# Altium PCB Pod_Islands_Panel.PcbDoc (part 8 of 10)
Units mm, origin at the board's own origin, x right, y up, seen from the top; angles counter-clockwise.
Board outline 95.7 x 83.7 mm, 6 copper layers (Top Layer, Inner1, Inner2, Inner3, Inner4, Bottom Layer), stack 0.82 mm thick; 1100 components, 940 nets, 4944 pads, 3680 vias.
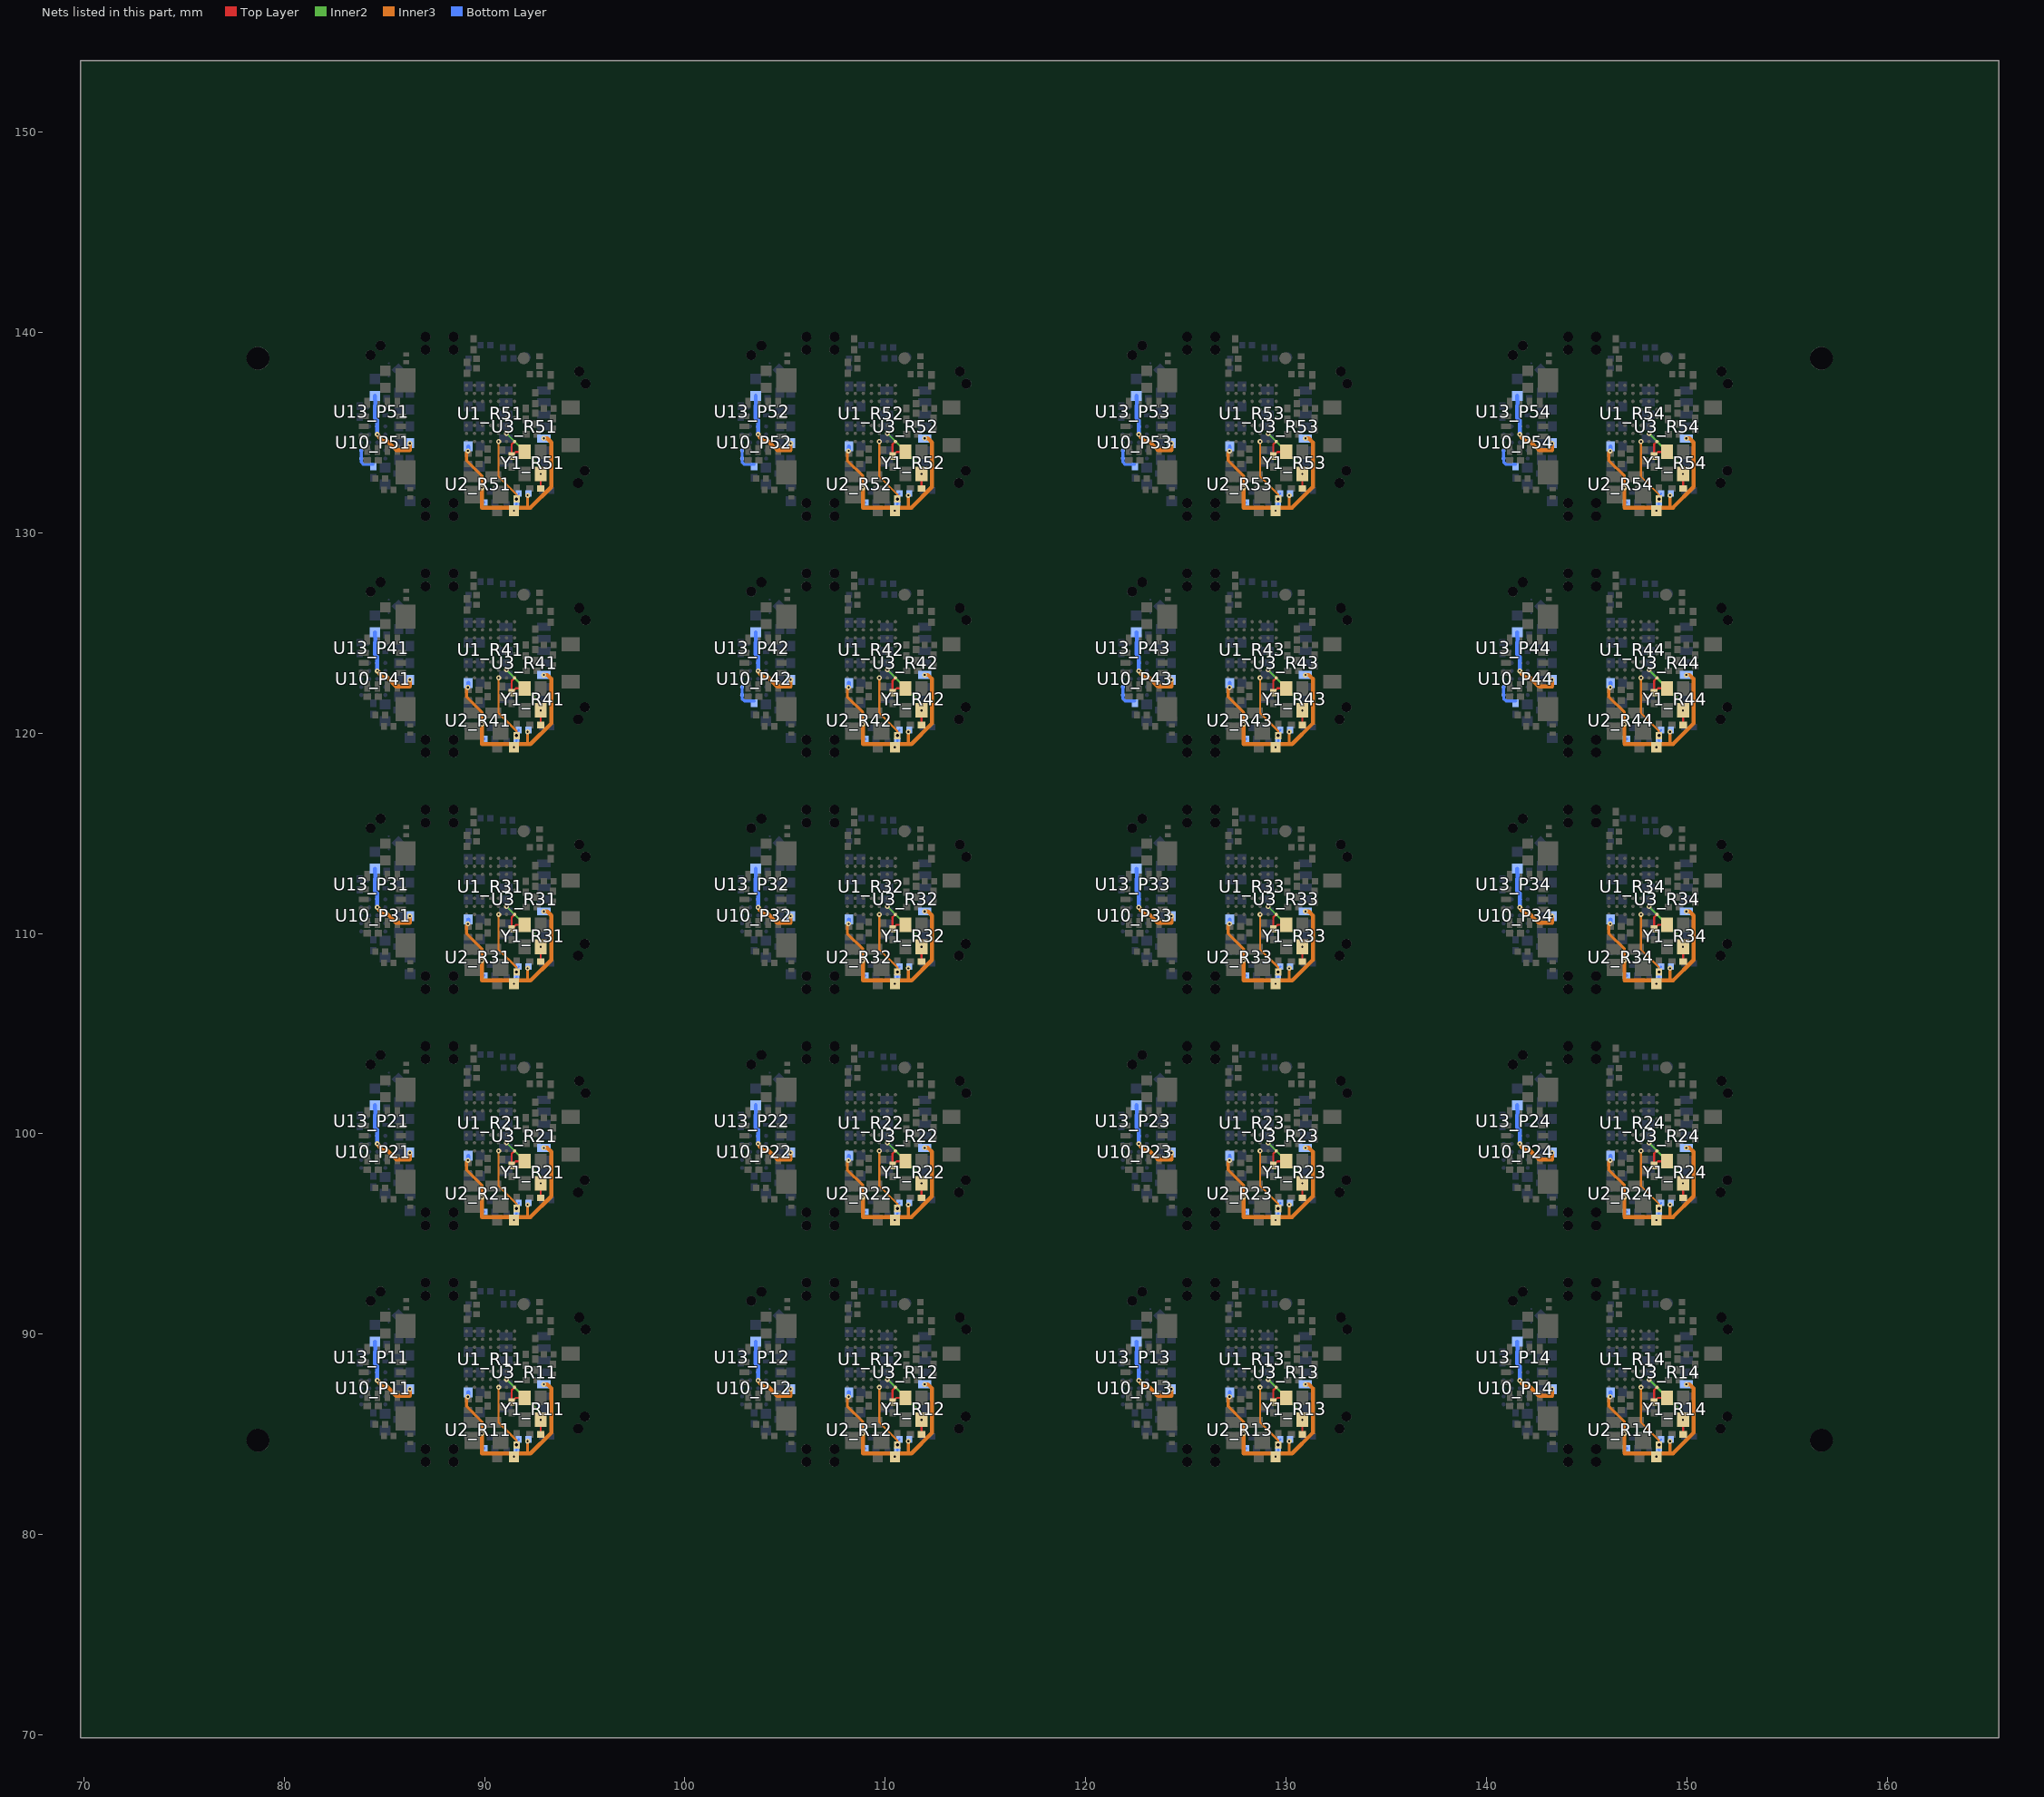
[diagram p12: the nets of this part, all layers, seen from the top]

## Via types
v1: diameter 0.249, hole 0.102, Top Layer to Inner1, 920 vias
v2: diameter 0.249, hole 0.102, Inner1 to Bottom Layer, 740 vias
v3: diameter 0.249, hole 0.102, Top Layer to Inner4, 580 vias
v4: diameter 0.249, hole 0.152, Top Layer to Bottom Layer, 540 vias
v5: diameter 0.249, hole 0.102, Inner4 to Bottom Layer, 520 vias
v6: diameter 0.3, hole 0.152, Inner1 to Inner4, 380 vias

## Nets (pads, with @x,y where several pads share a name; then routed paths per layer and width w, separated by ;. In a path a pad name is that pad's centre, name@x,y a point inside that pad or via, vN(x,y) a via of type N, cw(c..) or ccw(c..) an arc to the next point about the centre after c; other vN are vias at no path point) (continued)
VINLS_P42: C56_P42.1 U10_P42.D4 U10_P42.E4 | length 1.2
  Bottom Layer w0.15: U10_P42.D4@102.85,122.3 U10_P42.E4@102.85,121.9 102.85,121.72 102.97,121.6 C56_P42.1@103.449,121.6
VINLS_P43: C56_P43.1 U10_P43.D4 U10_P43.E4 | length 1.2
  Bottom Layer w0.15: U10_P43.D4@121.85,122.3 U10_P43.E4@121.85,121.9 121.85,121.72 121.97,121.6 C56_P43.1@122.449,121.6
VINLS_P44: C56_P44.1 U10_P44.D4 U10_P44.E4 | length 1.2
  Bottom Layer w0.15: U10_P44.D4@140.85,122.3 U10_P44.E4@140.85,121.9 140.85,121.72 140.97,121.6 C56_P44.1@141.449,121.6
VINLS_P51: C56_P51.1 U10_P51.D4 U10_P51.E4 | length 1.2
  Bottom Layer w0.15: U10_P51.D4@83.85,134.1 83.85,133.699 83.85,133.52 83.97,133.4 C56_P51.1@84.449,133.4
VINLS_P52: C56_P52.1 U10_P52.D4 U10_P52.E4 | length 1.2
  Bottom Layer w0.15: U10_P52.D4@102.85,134.1 102.85,133.699 102.85,133.52 102.97,133.4 C56_P52.1@103.449,133.4
VINLS_P53: C56_P53.1 U10_P53.D4 U10_P53.E4 | length 1.2
  Bottom Layer w0.15: U10_P53.D4@121.85,134.1 121.85,133.699 121.85,133.52 121.97,133.4 C56_P53.1@122.449,133.4
VINLS_P54: C56_P54.1 U10_P54.D4 U10_P54.E4 | length 1.2
  Bottom Layer w0.15: U10_P54.D4@140.85,134.1 140.85,133.699 140.85,133.52 140.97,133.4 C56_P54.1@141.449,133.4
VSYS_P11: C51_P11.1 pad.JP2@86.274,87.261 U10_P11.A2 U10_P11.B2 U13_P11.A1 U13_P11.B1 | length 4.3
  Inner3 w0.2: v2(84.65,87.7) 84.725,87.625 84.725,87.575 84.925,87.375 85.15,87.375 85.6,86.925 86.275,86.925 v2(86.275,87.261)
  Bottom Layer w0.2: C51_P11.1@84.531,89.631 84.551,89.15 84.525,89.124 84.525,89.026 84.525,88.676 84.525,88.525 84.65,88.4 U10_P11.A2@84.65,88.1 v2(84.65,87.7)
VSYS_P12: C51_P12.1 pad.JP2@105.276,87.261 U10_P12.A2 U10_P12.B2 U13_P12.A1 U13_P12.B1 | length 4.3
  Inner3 w0.2: v2(103.65,87.7) 103.725,87.625 103.725,87.575 103.925,87.375 104.15,87.375 104.6,86.925 105.275,86.925 v2(105.275,87.261)
  Bottom Layer w0.2: C51_P12.1@103.531,89.631 103.551,89.15 103.525,89.124 103.525,89.026 103.525,88.676 103.525,88.525 103.65,88.4 U10_P12.A2@103.65,88.1 v2(103.65,87.7)
VSYS_P13: C51_P13.1 pad.JP2@124.275,87.261 U10_P13.A2 U10_P13.B2 U13_P13.A1 U13_P13.B1 | length 4.3
  Inner3 w0.2: v2(122.65,87.7) 122.725,87.625 122.725,87.575 122.925,87.375 123.15,87.375 123.6,86.925 124.275,86.925 v2(124.275,87.261)
  Bottom Layer w0.2: C51_P13.1@122.531,89.631 122.551,89.15 122.525,89.124 122.525,89.026 122.525,88.676 122.525,88.525 122.65,88.4 U10_P13.A2@122.65,88.1 v2(122.65,87.7)
VSYS_P14: C51_P14.1 pad.JP2@143.274,87.261 U10_P14.A2 U10_P14.B2 U13_P14.A1 U13_P14.B1 | length 4.3
  Inner3 w0.2: v2(141.65,87.7) 141.725,87.625 141.725,87.575 141.925,87.375 142.15,87.375 142.6,86.925 143.275,86.925 v2(143.275,87.261)
  Bottom Layer w0.2: C51_P14.1@141.531,89.631 141.551,89.15 141.525,89.124 141.525,89.026 141.525,88.676 141.525,88.525 141.65,88.4 U10_P14.A2@141.65,88.1 v2(141.65,87.7)
VSYS_P21: C51_P21.1 pad.JP2@86.274,99.062 U10_P21.A2 U10_P21.B2 U13_P21.A1 U13_P21.B1 | length 4.3
  Inner3 w0.2: v2(84.65,99.5) 84.725,99.425 84.725,99.375 84.925,99.175 85.15,99.175 85.6,98.725 86.275,98.725 v2(86.275,99.061)
  Bottom Layer w0.2: C51_P21.1@84.53,101.43 84.551,100.95 84.525,100.924 U13_P21.A1@84.525,100.825 U13_P21.B1@84.525,100.475 84.525,100.325 84.65,100.2 84.65,99.899 v2(84.65,99.5)
VSYS_P22: C51_P22.1 pad.JP2@105.276,99.062 U10_P22.A2 U10_P22.B2 U13_P22.A1 U13_P22.B1 | length 4.3
  Inner3 w0.2: v2(103.65,99.5) 103.725,99.425 103.725,99.375 103.925,99.175 104.15,99.175 104.6,98.725 105.275,98.725 v2(105.275,99.061)
  Bottom Layer w0.2: C51_P22.1@103.53,101.43 103.551,100.95 103.525,100.924 U13_P22.A1@103.525,100.825 U13_P22.B1@103.525,100.475 103.525,100.325 103.65,100.2 103.65,99.899 v2(103.65,99.5)
VSYS_P23: C51_P23.1 pad.JP2@124.275,99.062 U10_P23.A2 U10_P23.B2 U13_P23.A1 U13_P23.B1 | length 4.3
  Inner3 w0.2: v2(122.65,99.5) 122.725,99.425 122.725,99.375 122.925,99.175 123.15,99.175 123.6,98.725 124.275,98.725 v2(124.275,99.061)
  Bottom Layer w0.2: C51_P23.1@122.53,101.43 122.551,100.95 122.525,100.924 U13_P23.A1@122.525,100.825 U13_P23.B1@122.525,100.475 122.525,100.325 122.65,100.2 122.65,99.899 v2(122.65,99.5)
VSYS_P24: C51_P24.1 pad.JP2@143.274,99.062 U10_P24.A2 U10_P24.B2 U13_P24.A1 U13_P24.B1 | length 4.3
  Inner3 w0.2: v2(141.65,99.5) 141.725,99.425 141.725,99.375 141.925,99.175 142.15,99.175 142.6,98.725 143.275,98.725 v2(143.275,99.061)
  Bottom Layer w0.2: C51_P24.1@141.531,101.431 141.551,100.95 141.525,100.924 U13_P24.A1@141.525,100.825 U13_P24.B1@141.525,100.475 141.525,100.325 141.65,100.2 141.65,99.899 v2(141.65,99.5)
VSYS_P31: C51_P31.1 pad.JP2@86.274,110.86 U10_P31.A2 U10_P31.B2 U13_P31.A1 U13_P31.B1 | length 4.3
  Inner3 w0.2: v2(84.65,111.3) 84.725,111.225 84.725,111.175 84.925,110.975 85.15,110.975 85.6,110.525 86.275,110.525 v2(86.275,110.861)
  Bottom Layer w0.2: C51_P31.1@84.53,113.23 84.551,112.75 84.525,112.724 U13_P31.A1@84.525,112.625 U13_P31.B1@84.525,112.275 84.525,112.125 84.65,112 U10_P31.A2@84.65,111.7 v2(84.65,111.3)
VSYS_P32: C51_P32.1 pad.JP2@105.276,110.86 U10_P32.A2 U10_P32.B2 U13_P32.A1 U13_P32.B1 | length 4.3
  Inner3 w0.2: v2(103.65,111.3) 103.725,111.225 103.725,111.175 103.925,110.975 104.15,110.975 104.6,110.525 105.275,110.525 v2(105.275,110.861)
  Bottom Layer w0.2: C51_P32.1@103.53,113.23 103.551,112.75 103.525,112.724 U13_P32.A1@103.525,112.625 U13_P32.B1@103.525,112.275 103.525,112.125 103.65,112 U10_P32.A2@103.65,111.7 v2(103.65,111.3)
VSYS_P33: C51_P33.1 pad.JP2@124.275,110.86 U10_P33.A2 U10_P33.B2 U13_P33.A1 U13_P33.B1 | length 4.3
  Inner3 w0.2: v2(122.65,111.3) 122.725,111.225 122.725,111.175 122.925,110.975 123.15,110.975 123.6,110.525 124.275,110.525 v2(124.275,110.861)
  Bottom Layer w0.2: C51_P33.1@122.53,113.23 122.551,112.75 122.525,112.724 U13_P33.A1@122.525,112.625 U13_P33.B1@122.525,112.275 122.525,112.125 122.65,112 U10_P33.A2@122.65,111.7 v2(122.65,111.3)
VSYS_P34: C51_P34.1 pad.JP2@143.274,110.86 U10_P34.A2 U10_P34.B2 U13_P34.A1 U13_P34.B1 | length 4.3
  Inner3 w0.2: v2(141.65,111.3) 141.725,111.225 141.725,111.175 141.925,110.975 142.15,110.975 142.6,110.525 143.275,110.525 v2(143.275,110.861)
  Bottom Layer w0.2: C51_P34.1@141.531,113.231 141.551,112.75 141.525,112.724 U13_P34.A1@141.525,112.625 U13_P34.B1@141.525,112.275 141.525,112.125 141.65,112 U10_P34.A2@141.65,111.7 v2(141.65,111.3)
VSYS_P41: C51_P41.1 pad.JP2@86.274,122.661 U10_P41.A2 U10_P41.B2 U13_P41.A1 U13_P41.B1 | length 4.3
  Inner3 w0.2: v2(84.65,123.1) 84.725,123.025 84.725,122.975 84.925,122.775 85.15,122.775 85.6,122.325 86.275,122.325 v2(86.275,122.661)
  Bottom Layer w0.2: C51_P41.1@84.531,125.031 84.551,124.55 84.525,124.524 84.525,124.426 84.525,124.076 84.525,123.925 84.65,123.8 U10_P41.A2@84.65,123.5 v2(84.65,123.1)
VSYS_P42: C51_P42.1 pad.JP2@105.276,122.661 U10_P42.A2 U10_P42.B2 U13_P42.A1 U13_P42.B1 | length 4.3
  Inner3 w0.2: v2(103.65,123.1) 103.725,123.025 103.725,122.975 103.925,122.775 104.15,122.775 104.6,122.325 105.275,122.325 v2(105.275,122.661)
  Bottom Layer w0.2: C51_P42.1@103.531,125.031 103.551,124.55 103.525,124.524 103.525,124.426 103.525,124.076 103.525,123.925 103.65,123.8 U10_P42.A2@103.65,123.5 v2(103.65,123.1)
VSYS_P43: C51_P43.1 pad.JP2@124.275,122.661 U10_P43.A2 U10_P43.B2 U13_P43.A1 U13_P43.B1 | length 4.3
  Inner3 w0.2: v2(122.65,123.1) 122.725,123.025 122.725,122.975 122.925,122.775 123.15,122.775 123.6,122.325 124.275,122.325 v2(124.275,122.661)
  Bottom Layer w0.2: C51_P43.1@122.531,125.031 122.551,124.55 122.525,124.524 122.525,124.426 122.525,124.076 122.525,123.925 122.65,123.8 U10_P43.A2@122.65,123.5 v2(122.65,123.1)
VSYS_P44: C51_P44.1 pad.JP2@143.274,122.661 U10_P44.A2 U10_P44.B2 U13_P44.A1 U13_P44.B1 | length 4.3
  Inner3 w0.2: v2(141.65,123.1) 141.725,123.025 141.725,122.975 141.925,122.775 142.15,122.775 142.6,122.325 143.275,122.325 v2(143.275,122.661)
  Bottom Layer w0.2: C51_P44.1@141.531,125.031 141.551,124.55 141.525,124.524 141.525,124.426 141.525,124.076 141.525,123.925 141.65,123.8 U10_P44.A2@141.65,123.5 v2(141.65,123.1)
VSYS_P51: C51_P51.1 pad.JP2@86.274,134.462 U10_P51.A2 U10_P51.B2 U13_P51.A1 U13_P51.B1 | length 4.3
  Inner3 w0.2: v2(84.65,134.9) 84.725,134.825 84.725,134.775 84.925,134.575 85.15,134.575 85.6,134.125 86.275,134.125 v2(86.275,134.461)
  Bottom Layer w0.2: C51_P51.1@84.53,136.83 84.551,136.35 84.525,136.324 U13_P51.A1@84.525,136.225 U13_P51.B1@84.525,135.875 84.525,135.725 84.65,135.6 84.65,135.299 v2(84.65,134.9)
VSYS_P52: C51_P52.1 pad.JP2@105.276,134.462 U10_P52.A2 U10_P52.B2 U13_P52.A1 U13_P52.B1 | length 4.3
  Inner3 w0.2: v2(103.65,134.9) 103.725,134.825 103.725,134.775 103.925,134.575 104.15,134.575 104.6,134.125 105.275,134.125 v2(105.275,134.461)
  Bottom Layer w0.2: C51_P52.1@103.53,136.83 103.551,136.35 103.525,136.324 U13_P52.A1@103.525,136.225 U13_P52.B1@103.525,135.875 103.525,135.725 103.65,135.6 103.65,135.299 v2(103.65,134.9)
VSYS_P53: C51_P53.1 pad.JP2@124.275,134.462 U10_P53.A2 U10_P53.B2 U13_P53.A1 U13_P53.B1 | length 4.3
  Inner3 w0.2: v2(122.65,134.9) 122.725,134.825 122.725,134.775 122.925,134.575 123.15,134.575 123.6,134.125 124.275,134.125 v2(124.275,134.461)
  Bottom Layer w0.2: C51_P53.1@122.53,136.83 122.551,136.35 122.525,136.324 U13_P53.A1@122.525,136.225 U13_P53.B1@122.525,135.875 122.525,135.725 122.65,135.6 122.65,135.299 v2(122.65,134.9)
VSYS_P54: C51_P54.1 pad.JP2@143.274,134.462 U10_P54.A2 U10_P54.B2 U13_P54.A1 U13_P54.B1 | length 4.3
  Inner3 w0.2: v2(141.65,134.9) 141.725,134.825 141.725,134.775 141.925,134.575 142.15,134.575 142.6,134.125 143.275,134.125 v2(143.275,134.461)
  Bottom Layer w0.2: C51_P54.1@141.531,136.831 141.551,136.35 141.525,136.324 U13_P54.A1@141.525,136.225 U13_P54.B1@141.525,135.875 141.525,135.725 141.65,135.6 141.65,135.299 v2(141.65,134.9)
VSYS_R11: C20_R11.1 C30_R11.1 pad.JR2@89.185,87.101 R40_R11.1 U2_R11.A1 U2_R11.B1 U3_R11.5 | length 11.9
  Inner3 w0.15: v2(89.17,86.88) 89.1,86.81 89.1,86.4 89.876,85.624 v2(89.876,85.046) ; 92.15,84.05 v2(92.15,84.66)
  Inner3 w0.2: v2(89.876,85.046) 89.876,84.05 91.471,84.05 ; v3(91.471,83.89) 91.471,84.05 ; v2(92.959,87.5) 93.13,87.5 93.33,87.3 93.33,85.08 92.3,84.05 92.15,84.05 91.471,84.05
  Bottom Layer w0.15: U2_R11.A1@89.875,85.395 v2(89.876,85.046) 89.876,84.398 C20_R11.1@89.975,84.299
  Bottom Layer w0.2: v2(89.17,86.88) 89.185,86.895 pad.JR2@89.185,87.101
VSYS_R12: C20_R12.1 C30_R12.1 pad.JR2@108.184,87.101 R40_R12.1 U2_R12.A1 U2_R12.B1 U3_R12.5 | length 11.9
  Inner3 w0.15: v2(108.17,86.88) 108.1,86.81 108.1,86.4 108.876,85.624 v2(108.876,85.046) ; 111.15,84.05 v2(111.15,84.66)
  Inner3 w0.2: v2(108.876,85.046) 108.876,84.05 110.471,84.05 ; v3(110.471,83.89) 110.471,84.05 ; v2(111.959,87.5) 112.13,87.5 112.33,87.3 112.33,85.08 111.3,84.05 111.15,84.05 110.471,84.05
  Bottom Layer w0.15: U2_R12.A1@108.875,85.395 v2(108.876,85.046) 108.876,84.398 C20_R12.1@108.976,84.3
  Bottom Layer w0.2: v2(108.17,86.88) 108.185,86.895 pad.JR2@108.185,87.101
VSYS_R13: C20_R13.1 C30_R13.1 pad.JR2@127.186,87.101 R40_R13.1 U2_R13.A1 U2_R13.B1 U3_R13.5 | length 11.9
  Inner3 w0.15: v2(127.17,86.88) 127.1,86.81 127.1,86.4 127.876,85.624 v2(127.876,85.046) ; 130.15,84.05 v2(130.15,84.66)
  Inner3 w0.2: v2(127.876,85.046) 127.876,84.05 129.471,84.05 ; v3(129.471,83.89) 129.471,84.05 ; v2(130.959,87.5) 131.13,87.5 131.33,87.3 131.33,85.08 130.3,84.05 130.15,84.05 129.471,84.05
  Bottom Layer w0.15: U2_R13.A1@127.876,85.394 v2(127.876,85.046) 127.876,84.398 C20_R13.1@127.976,84.3
  Bottom Layer w0.2: v2(127.17,86.88) 127.185,86.895 pad.JR2@127.186,87.101
VSYS_R14: C20_R14.1 C30_R14.1 pad.JR2@146.185,87.101 R40_R14.1 U2_R14.A1 U2_R14.B1 U3_R14.5 | length 11.9
  Inner3 w0.15: v2(146.17,86.88) 146.1,86.81 146.1,86.4 146.876,85.624 v2(146.876,85.046) ; 149.15,84.05 v2(149.15,84.66)
  Inner3 w0.2: v2(146.876,85.046) 146.876,84.05 148.471,84.05 ; v3(148.471,83.89) 148.471,84.05 ; v2(149.959,87.5) 150.13,87.5 150.33,87.3 150.33,85.08 149.3,84.05 149.15,84.05 148.471,84.05
  Bottom Layer w0.15: U2_R14.A1@146.875,85.395 v2(146.876,85.046) 146.876,84.398 C20_R14.1@146.976,84.3
  Bottom Layer w0.2: v2(146.17,86.88) 146.185,86.895 pad.JR2@146.185,87.101
VSYS_R21: C20_R21.1 C30_R21.1 pad.JR2@89.185,98.902 R40_R21.1 U2_R21.A1 U2_R21.B1 U3_R21.5 | length 11.9
  Inner3 w0.15: v2(89.17,98.68) 89.1,98.61 89.1,98.2 89.876,97.424 v2(89.876,96.846) ; 92.15,95.85 v2(92.15,96.46)
  Inner3 w0.2: v2(89.876,96.846) 89.876,95.85 91.471,95.85 ; v3(91.471,95.69) 91.471,95.85 ; v2(92.959,99.3) 93.13,99.3 93.33,99.1 93.33,96.88 92.3,95.85 92.15,95.85 91.471,95.85
  Bottom Layer w0.15: U2_R21.A1@89.876,97.194 v2(89.876,96.846) 89.876,96.198 C20_R21.1@89.975,96.099
  Bottom Layer w0.2: v2(89.17,98.68) 89.185,98.695 pad.JR2@89.185,98.901
VSYS_R22: C20_R22.1 C30_R22.1 pad.JR2@108.184,98.902 R40_R22.1 U2_R22.A1 U2_R22.B1 U3_R22.5 | length 11.9
  Inner3 w0.15: v2(108.17,98.68) 108.1,98.61 108.1,98.2 108.876,97.424 v2(108.876,96.846) ; 111.15,95.85 v2(111.15,96.46)
  Inner3 w0.2: v2(108.876,96.846) 108.876,95.85 110.471,95.85 ; v3(110.471,95.69) 110.471,95.85 ; v2(111.959,99.3) 112.13,99.3 112.33,99.1 112.33,96.88 111.3,95.85 111.15,95.85 110.471,95.85
  Bottom Layer w0.15: U2_R22.A1@108.876,97.194 v2(108.876,96.846) 108.876,96.198 C20_R22.1@108.975,96.099
  Bottom Layer w0.2: v2(108.17,98.68) 108.185,98.695 pad.JR2@108.185,98.901
VSYS_R23: C20_R23.1 C30_R23.1 pad.JR2@127.186,98.902 R40_R23.1 U2_R23.A1 U2_R23.B1 U3_R23.5 | length 11.9
  Inner3 w0.15: v2(127.17,98.68) 127.1,98.61 127.1,98.2 127.876,97.424 v2(127.876,96.846) ; 130.15,95.85 v2(130.15,96.46)
  Inner3 w0.2: v2(127.876,96.846) 127.876,95.85 129.471,95.85 ; v3(129.471,95.69) 129.471,95.85 ; v2(130.959,99.3) 131.13,99.3 131.33,99.1 131.33,96.88 130.3,95.85 130.15,95.85 129.471,95.85
  Bottom Layer w0.15: U2_R23.A1@127.876,97.194 v2(127.876,96.846) 127.876,96.198 C20_R23.1@127.975,96.099
  Bottom Layer w0.2: v2(127.17,98.68) 127.185,98.695 pad.JR2@127.185,98.901
VSYS_R24: C20_R24.1 C30_R24.1 pad.JR2@146.185,98.902 R40_R24.1 U2_R24.A1 U2_R24.B1 U3_R24.5 | length 11.9
  Inner3 w0.15: v2(146.17,98.68) 146.1,98.61 146.1,98.2 146.876,97.424 v2(146.876,96.846) ; 149.15,95.85 v2(149.15,96.46)
  Inner3 w0.2: v2(146.876,96.846) 146.876,95.85 148.471,95.85 ; v3(148.471,95.69) 148.471,95.85 ; v2(149.959,99.3) 150.13,99.3 150.33,99.1 150.33,96.88 149.3,95.85 149.15,95.85 148.471,95.85
  Bottom Layer w0.15: U2_R24.A1@146.876,97.194 v2(146.876,96.846) 146.876,96.198 C20_R24.1@146.975,96.099
  Bottom Layer w0.2: v2(146.17,98.68) 146.185,98.695 pad.JR2@146.185,98.901
VSYS_R31: C20_R31.1 C30_R31.1 pad.JR2@89.185,110.7 R40_R31.1 U2_R31.A1 U2_R31.B1 U3_R31.5 | length 11.9
  Inner3 w0.15: v2(89.17,110.48) 89.1,110.41 89.1,110 89.876,109.224 v2(89.876,108.646) ; 92.15,107.65 v2(92.15,108.26)
  Inner3 w0.2: v2(89.876,108.646) 89.876,107.65 91.471,107.65 ; v3(91.471,107.49) 91.471,107.65 ; v2(92.959,111.1) 93.13,111.1 93.33,110.9 93.33,108.68 92.3,107.65 92.15,107.65 91.471,107.65
  Bottom Layer w0.15: U2_R31.A1@89.875,108.995 v2(89.876,108.646) 89.876,107.998 C20_R31.1@89.975,107.899
  Bottom Layer w0.2: v2(89.17,110.48) 89.185,110.495 pad.JR2@89.185,110.7
VSYS_R32: C20_R32.1 C30_R32.1 pad.JR2@108.184,110.7 R40_R32.1 U2_R32.A1 U2_R32.B1 U3_R32.5 | length 11.9
  Inner3 w0.15: v2(108.17,110.48) 108.1,110.41 108.1,110 108.876,109.224 v2(108.876,108.646) ; 111.15,107.65 v2(111.15,108.26)
  Inner3 w0.2: v2(108.876,108.646) 108.876,107.65 110.471,107.65 ; v3(110.471,107.49) 110.471,107.65 ; v2(111.959,111.1) 112.13,111.1 112.33,110.9 112.33,108.68 111.3,107.65 111.15,107.65 110.471,107.65
  Bottom Layer w0.15: U2_R32.A1@108.875,108.995 v2(108.876,108.646) 108.876,107.998 C20_R32.1@108.976,107.9
  Bottom Layer w0.2: v2(108.17,110.48) 108.185,110.495 pad.JR2@108.185,110.701
VSYS_R33: C20_R33.1 C30_R33.1 pad.JR2@127.186,110.7 R40_R33.1 U2_R33.A1 U2_R33.B1 U3_R33.5 | length 11.9
  Inner3 w0.15: v2(127.17,110.48) 127.1,110.41 127.1,110 127.876,109.224 v2(127.876,108.646) ; 130.15,107.65 v2(130.15,108.26)
  Inner3 w0.2: v2(127.876,108.646) 127.876,107.65 129.471,107.65 ; v3(129.471,107.49) 129.471,107.65 ; v2(130.959,111.1) 131.13,111.1 131.33,110.9 131.33,108.68 130.3,107.65 130.15,107.65 129.471,107.65
  Bottom Layer w0.15: U2_R33.A1@127.876,108.994 v2(127.876,108.646) 127.876,107.998 C20_R33.1@127.976,107.9
  Bottom Layer w0.2: v2(127.17,110.48) 127.185,110.495 pad.JR2@127.186,110.7
VSYS_R34: C20_R34.1 C30_R34.1 pad.JR2@146.185,110.7 R40_R34.1 U2_R34.A1 U2_R34.B1 U3_R34.5 | length 11.9
  Inner3 w0.15: v2(146.17,110.48) 146.1,110.41 146.1,110 146.876,109.224 v2(146.876,108.646) ; 149.15,107.65 v2(149.15,108.26)
  Inner3 w0.2: v2(146.876,108.646) 146.876,107.65 148.471,107.65 ; v3(148.471,107.49) 148.471,107.65 ; v2(149.959,111.1) 150.13,111.1 150.33,110.9 150.33,108.68 149.3,107.65 149.15,107.65 148.471,107.65
  Bottom Layer w0.15: U2_R34.A1@146.875,108.995 v2(146.876,108.646) 146.876,107.998 C20_R34.1@146.976,107.9
  Bottom Layer w0.2: v2(146.17,110.48) 146.185,110.495 pad.JR2@146.185,110.7
VSYS_R41: C20_R41.1 C30_R41.1 pad.JR2@89.185,122.501 R40_R41.1 U2_R41.A1 U2_R41.B1 U3_R41.5 | length 11.9
  Inner3 w0.15: v2(89.17,122.28) 89.1,122.21 89.1,121.8 89.876,121.024 v2(89.876,120.446) ; 92.15,119.45 v2(92.15,120.06)
  Inner3 w0.2: v2(89.876,120.446) 89.876,119.45 91.471,119.45 ; v3(91.471,119.29) 91.471,119.45 ; v2(92.959,122.9) 93.13,122.9 93.33,122.7 93.33,120.48 92.3,119.45 92.15,119.45 91.471,119.45
  Bottom Layer w0.15: U2_R41.A1@89.875,120.795 v2(89.876,120.446) 89.876,119.798 C20_R41.1@89.975,119.699
  Bottom Layer w0.2: v2(89.17,122.28) 89.185,122.295 pad.JR2@89.185,122.501
VSYS_R42: C20_R42.1 C30_R42.1 pad.JR2@108.184,122.501 R40_R42.1 U2_R42.A1 U2_R42.B1 U3_R42.5 | length 11.9
  Inner3 w0.15: v2(108.17,122.28) 108.1,122.21 108.1,121.8 108.876,121.024 v2(108.876,120.446) ; 111.15,119.45 v2(111.15,120.06)
  Inner3 w0.2: v2(108.876,120.446) 108.876,119.45 110.471,119.45 ; v3(110.471,119.29) 110.471,119.45 ; v2(111.959,122.9) 112.13,122.9 112.33,122.7 112.33,120.48 111.3,119.45 111.15,119.45 110.471,119.45
  Bottom Layer w0.15: U2_R42.A1@108.875,120.795 v2(108.876,120.446) 108.876,119.798 C20_R42.1@108.976,119.7
  Bottom Layer w0.2: v2(108.17,122.28) 108.185,122.295 pad.JR2@108.185,122.501
VSYS_R43: C20_R43.1 C30_R43.1 pad.JR2@127.186,122.501 R40_R43.1 U2_R43.A1 U2_R43.B1 U3_R43.5 | length 11.9
  Inner3 w0.15: v2(127.17,122.28) 127.1,122.21 127.1,121.8 127.876,121.024 v2(127.876,120.446) ; 130.15,119.45 v2(130.15,120.06)
  Inner3 w0.2: v2(127.876,120.446) 127.876,119.45 129.471,119.45 ; v3(129.471,119.29) 129.471,119.45 ; v2(130.959,122.9) 131.13,122.9 131.33,122.7 131.33,120.48 130.3,119.45 130.15,119.45 129.471,119.45
  Bottom Layer w0.15: U2_R43.A1@127.876,120.794 v2(127.876,120.446) 127.876,119.798 C20_R43.1@127.976,119.7
  Bottom Layer w0.2: v2(127.17,122.28) 127.185,122.295 pad.JR2@127.186,122.501
VSYS_R44: C20_R44.1 C30_R44.1 pad.JR2@146.185,122.501 R40_R44.1 U2_R44.A1 U2_R44.B1 U3_R44.5 | length 11.9
  Inner3 w0.15: v2(146.17,122.28) 146.1,122.21 146.1,121.8 146.876,121.024 v2(146.876,120.446) ; 149.15,119.45 v2(149.15,120.06)
  Inner3 w0.2: v2(146.876,120.446) 146.876,119.45 148.471,119.45 ; v3(148.471,119.29) 148.471,119.45 ; v2(149.959,122.9) 150.13,122.9 150.33,122.7 150.33,120.48 149.3,119.45 149.15,119.45 148.471,119.45
  Bottom Layer w0.15: U2_R44.A1@146.875,120.795 v2(146.876,120.446) 146.876,119.798 C20_R44.1@146.976,119.7
  Bottom Layer w0.2: v2(146.17,122.28) 146.185,122.295 pad.JR2@146.185,122.501
VSYS_R51: C20_R51.1 C30_R51.1 pad.JR2@89.185,134.302 R40_R51.1 U2_R51.A1 U2_R51.B1 U3_R51.5 | length 11.9
  Inner3 w0.15: v2(89.17,134.08) 89.1,134.01 89.1,133.6 89.876,132.824 v2(89.876,132.246) ; 92.15,131.25 v2(92.15,131.86)
  Inner3 w0.2: v2(89.876,132.246) 89.876,131.25 91.471,131.25 ; v3(91.471,131.09) 91.471,131.25 ; v2(92.959,134.7) 93.13,134.7 93.33,134.5 93.33,132.28 92.3,131.25 92.15,131.25 91.471,131.25
  Bottom Layer w0.15: U2_R51.A1@89.876,132.594 v2(89.876,132.246) 89.876,131.598 C20_R51.1@89.975,131.499
  Bottom Layer w0.2: v2(89.17,134.08) 89.185,134.095 pad.JR2@89.185,134.301
VSYS_R52: C20_R52.1 C30_R52.1 pad.JR2@108.184,134.302 R40_R52.1 U2_R52.A1 U2_R52.B1 U3_R52.5 | length 11.9
  Inner3 w0.15: v2(108.17,134.08) 108.1,134.01 108.1,133.6 108.876,132.824 v2(108.876,132.246) ; 111.15,131.25 v2(111.15,131.86)
  Inner3 w0.2: v2(108.876,132.246) 108.876,131.25 110.471,131.25 ; v3(110.471,131.09) 110.471,131.25 ; v2(111.959,134.7) 112.13,134.7 112.33,134.5 112.33,132.28 111.3,131.25 111.15,131.25 110.471,131.25
  Bottom Layer w0.15: U2_R52.A1@108.876,132.594 v2(108.876,132.246) 108.876,131.598 C20_R52.1@108.975,131.499
  Bottom Layer w0.2: v2(108.17,134.08) 108.185,134.095 pad.JR2@108.185,134.301
VSYS_R53: C20_R53.1 C30_R53.1 pad.JR2@127.186,134.302 R40_R53.1 U2_R53.A1 U2_R53.B1 U3_R53.5 | length 11.9
  Inner3 w0.15: v2(127.17,134.08) 127.1,134.01 127.1,133.6 127.876,132.824 v2(127.876,132.246) ; 130.15,131.25 v2(130.15,131.86)
  Inner3 w0.2: v2(127.876,132.246) 127.876,131.25 129.471,131.25 ; v3(129.471,131.09) 129.471,131.25 ; v2(130.959,134.7) 131.13,134.7 131.33,134.5 131.33,132.28 130.3,131.25 130.15,131.25 129.471,131.25
  Bottom Layer w0.15: U2_R53.A1@127.876,132.594 v2(127.876,132.246) 127.876,131.598 C20_R53.1@127.975,131.499
  Bottom Layer w0.2: v2(127.17,134.08) 127.185,134.095 pad.JR2@127.185,134.301
VSYS_R54: C20_R54.1 C30_R54.1 pad.JR2@146.185,134.302 R40_R54.1 U2_R54.A1 U2_R54.B1 U3_R54.5 | length 11.9
  Inner3 w0.15: v2(146.17,134.08) 146.1,134.01 146.1,133.6 146.876,132.824 v2(146.876,132.246) ; 149.15,131.25 v2(149.15,131.86)
  Inner3 w0.2: v2(146.876,132.246) 146.876,131.25 148.471,131.25 ; v3(148.471,131.09) 148.471,131.25 ; v2(149.959,134.7) 150.13,134.7 150.33,134.5 150.33,132.28 149.3,131.25 149.15,131.25 148.471,131.25
  Bottom Layer w0.15: U2_R54.A1@146.876,132.594 v2(146.876,132.246) 146.876,131.598 C20_R54.1@146.975,131.499
  Bottom Layer w0.2: v2(146.17,134.08) 146.185,134.095 pad.JR2@146.185,134.301
VSYS_SENSE_R11: C12_R11.1 R40_R11.2 R41_R11.1 U1_R11.A3 | length 3.8
  Inner3 w0.1: v3(90.699,87.35) 90.699,85.6 91.601,84.698 v4(91.601,84.475)
  Bottom Layer w0.1: R41_R11.1@91.59,84.2 91.601,84.21 v4(91.601,84.475) 91.601,84.64 R40_R11.2@91.708,84.75
VSYS_SENSE_R12: C12_R12.1 R40_R12.2 R41_R12.1 U1_R12.A3 | length 3.8
  Inner3 w0.1: v3(109.699,87.35) 109.699,85.6 110.601,84.698 v4(110.601,84.475)
  Bottom Layer w0.1: R41_R12.1@110.59,84.2 110.601,84.21 v4(110.601,84.475) 110.601,84.64 R40_R12.2@110.708,84.75
VSYS_SENSE_R13: C12_R13.1 R40_R13.2 R41_R13.1 U1_R13.A3 | length 3.8
  Inner3 w0.1: v3(128.699,87.35) 128.699,85.6 129.601,84.698 v4(129.601,84.475)
  Bottom Layer w0.1: R41_R13.1@129.592,84.2 129.601,84.21 v4(129.601,84.475) 129.601,84.64 R40_R13.2@129.71,84.749
VSYS_SENSE_R14: C12_R14.1 R40_R14.2 R41_R14.1 U1_R14.A3 | length 3.8
  Inner3 w0.1: v3(147.699,87.35) 147.699,85.6 148.601,84.698 v4(148.601,84.475)
  Bottom Layer w0.1: R41_R14.1@148.59,84.2 148.601,84.21 v4(148.601,84.475) 148.601,84.64 R40_R14.2@148.708,84.75
VSYS_SENSE_R21: C12_R21.1 R40_R21.2 R41_R21.1 U1_R21.A3 | length 3.8
  Inner3 w0.1: v3(90.699,99.15) 90.699,97.4 91.601,96.498 v4(91.601,96.275)
  Bottom Layer w0.1: R41_R21.1@91.59,96 91.601,96.01 v4(91.601,96.275) 91.601,96.44 R40_R21.2@91.71,96.549
VSYS_SENSE_R22: C12_R22.1 R40_R22.2 R41_R22.1 U1_R22.A3 | length 3.8
  Inner3 w0.1: v3(109.699,99.15) 109.699,97.4 110.601,96.498 v4(110.601,96.275)
  Bottom Layer w0.1: R41_R22.1@110.59,96 110.601,96.01 v4(110.601,96.275) 110.601,96.44 R40_R22.2@110.71,96.549
VSYS_SENSE_R23: C12_R23.1 R40_R23.2 R41_R23.1 U1_R23.A3 | length 3.8
  Inner3 w0.1: v3(128.699,99.15) 128.699,97.4 129.601,96.498 v4(129.601,96.275)
  Bottom Layer w0.1: R41_R23.1@129.592,96 129.601,96.01 v4(129.601,96.275) 129.601,96.44 R40_R23.2@129.71,96.549
VSYS_SENSE_R24: C12_R24.1 R40_R24.2 R41_R24.1 U1_R24.A3 | length 3.8
  Inner3 w0.1: v3(147.699,99.15) 147.699,97.4 148.601,96.498 v4(148.601,96.275)
  Bottom Layer w0.1: R41_R24.1@148.59,96 148.601,96.01 v4(148.601,96.275) 148.601,96.44 R40_R24.2@148.71,96.549
VSYS_SENSE_R31: C12_R31.1 R40_R31.2 R41_R31.1 U1_R31.A3 | length 3.8
  Inner3 w0.1: v3(90.699,110.95) 90.699,109.2 91.601,108.298 v4(91.601,108.075)
  Bottom Layer w0.1: R41_R31.1@91.59,107.8 91.601,107.81 v4(91.601,108.075) 91.601,108.24 R40_R31.2@91.708,108.35
VSYS_SENSE_R32: C12_R32.1 R40_R32.2 R41_R32.1 U1_R32.A3 | length 3.8
  Inner3 w0.1: v3(109.699,110.95) 109.699,109.2 110.601,108.298 v4(110.601,108.075)
  Bottom Layer w0.1: R41_R32.1@110.59,107.8 110.601,107.81 v4(110.601,108.075) 110.601,108.24 R40_R32.2@110.708,108.35
VSYS_SENSE_R33: C12_R33.1 R40_R33.2 R41_R33.1 U1_R33.A3 | length 3.8
  Inner3 w0.1: v3(128.699,110.95) 128.699,109.2 129.601,108.298 v4(129.601,108.075)
  Bottom Layer w0.1: R41_R33.1@129.592,107.8 129.601,107.81 v4(129.601,108.075) 129.601,108.24 R40_R33.2@129.71,108.349
VSYS_SENSE_R34: C12_R34.1 R40_R34.2 R41_R34.1 U1_R34.A3 | length 3.8
  Inner3 w0.1: v3(147.699,110.95) 147.699,109.2 148.601,108.298 v4(148.601,108.075)
  Bottom Layer w0.1: R41_R34.1@148.59,107.8 148.601,107.81 v4(148.601,108.075) 148.601,108.24 R40_R34.2@148.708,108.35
VSYS_SENSE_R41: C12_R41.1 R40_R41.2 R41_R41.1 U1_R41.A3 | length 3.8
  Inner3 w0.1: v3(90.699,122.75) 90.699,121 91.601,120.098 v4(91.601,119.875)
  Bottom Layer w0.1: R41_R41.1@91.59,119.6 91.601,119.61 v4(91.601,119.875) 91.601,120.04 R40_R41.2@91.708,120.15
VSYS_SENSE_R42: C12_R42.1 R40_R42.2 R41_R42.1 U1_R42.A3 | length 3.8
  Inner3 w0.1: v3(109.699,122.75) 109.699,121 110.601,120.098 v4(110.601,119.875)
  Bottom Layer w0.1: R41_R42.1@110.59,119.6 110.601,119.61 v4(110.601,119.875) 110.601,120.04 R40_R42.2@110.708,120.15
VSYS_SENSE_R43: C12_R43.1 R40_R43.2 R41_R43.1 U1_R43.A3 | length 3.8
  Inner3 w0.1: v3(128.699,122.75) 128.699,121 129.601,120.098 v4(129.601,119.875)
  Bottom Layer w0.1: R41_R43.1@129.592,119.6 129.601,119.61 v4(129.601,119.875) 129.601,120.04 R40_R43.2@129.71,120.149
VSYS_SENSE_R44: C12_R44.1 R40_R44.2 R41_R44.1 U1_R44.A3 | length 3.8
  Inner3 w0.1: v3(147.699,122.75) 147.699,121 148.601,120.098 v4(148.601,119.875)
  Bottom Layer w0.1: R41_R44.1@148.59,119.6 148.601,119.61 v4(148.601,119.875) 148.601,120.04 R40_R44.2@148.708,120.15
VSYS_SENSE_R51: C12_R51.1 R40_R51.2 R41_R51.1 U1_R51.A3 | length 3.8
  Inner3 w0.1: v3(90.699,134.55) 90.699,132.8 91.601,131.898 v4(91.601,131.675)
  Bottom Layer w0.1: R41_R51.1@91.59,131.4 91.601,131.41 v4(91.601,131.675) 91.601,131.84 R40_R51.2@91.71,131.949
VSYS_SENSE_R52: C12_R52.1 R40_R52.2 R41_R52.1 U1_R52.A3 | length 3.8
  Inner3 w0.1: v3(109.699,134.55) 109.699,132.8 110.601,131.898 v4(110.601,131.675)
  Bottom Layer w0.1: R41_R52.1@110.59,131.4 110.601,131.41 v4(110.601,131.675) 110.601,131.84 R40_R52.2@110.71,131.949
VSYS_SENSE_R53: C12_R53.1 R40_R53.2 R41_R53.1 U1_R53.A3 | length 3.8
  Inner3 w0.1: v3(128.699,134.55) 128.699,132.8 129.601,131.898 v4(129.601,131.675)
  Bottom Layer w0.1: R41_R53.1@129.592,131.4 129.601,131.41 v4(129.601,131.675) 129.601,131.84 R40_R53.2@129.71,131.949
VSYS_SENSE_R54: C12_R54.1 R40_R54.2 R41_R54.1 U1_R54.A3 | length 3.8
  Inner3 w0.1: v3(147.699,134.55) 147.699,132.8 148.601,131.898 v4(148.601,131.675)
  Bottom Layer w0.1: R41_R54.1@148.59,131.4 148.601,131.41 v4(148.601,131.675) 148.601,131.84 R40_R54.2@148.71,131.949
XC1_R11: C1_R11.1 U1_R11.B2 Y1_R11.1 | length 3.5
  Top Layer w0.1: v3(92.799,85.729) C1_R11.1@92.804,85
  Inner2 w0.1: v3(91.1,87.751) 92.799,86.052 v3(92.799,85.729)
XC1_R12: C1_R12.1 U1_R12.B2 Y1_R12.1 | length 3.5
  Top Layer w0.1: v3(111.799,85.729) C1_R12.1@111.805,85
  Inner2 w0.1: v3@110.1,87.751 111.799,86.052 v3(111.799,85.729)
  other v3: 110.1,87.751
XC1_R13: C1_R13.1 U1_R13.B2 Y1_R13.1 | length 3.5
  Top Layer w0.1: v3(130.799,85.729) C1_R13.1@130.804,85
  Inner2 w0.1: v3(129.1,87.751) 130.799,86.052 v3(130.799,85.729)
XC1_R14: C1_R14.1 U1_R14.B2 Y1_R14.1 | length 3.5
  Top Layer w0.1: v3(149.799,85.729) C1_R14.1@149.804,85
  Inner2 w0.1: v3(148.1,87.751) 149.799,86.052 v3(149.799,85.729)
XC1_R21: C1_R21.1 U1_R21.B2 Y1_R21.1 | length 3.5
  Top Layer w0.1: v3(92.799,97.529) C1_R21.1@92.804,96.8
  Inner2 w0.1: v3(91.1,99.551) 92.799,97.852 v3(92.799,97.529)
XC1_R22: C1_R22.1 U1_R22.B2 Y1_R22.1 | length 3.5
  Top Layer w0.1: v3(111.799,97.529) C1_R22.1@111.805,96.8
  Inner2 w0.1: v3@110.1,99.551 111.799,97.852 v3(111.799,97.529)
  other v3: 110.1,99.551
XC1_R23: C1_R23.1 U1_R23.B2 Y1_R23.1 | length 3.5
  Top Layer w0.1: v3(130.799,97.529) C1_R23.1@130.804,96.8
  Inner2 w0.1: v3(129.1,99.551) 130.799,97.852 v3(130.799,97.529)
XC1_R24: C1_R24.1 U1_R24.B2 Y1_R24.1 | length 3.5
  Top Layer w0.1: v3(149.799,97.529) C1_R24.1@149.804,96.8
  Inner2 w0.1: v3(148.1,99.551) 149.799,97.852 v3(149.799,97.529)
XC1_R31: C1_R31.1 U1_R31.B2 Y1_R31.1 | length 3.5
  Top Layer w0.1: v3(92.799,109.329) C1_R31.1@92.804,108.6
  Inner2 w0.1: v3(91.1,111.351) 92.799,109.652 v3(92.799,109.329)
XC1_R32: C1_R32.1 U1_R32.B2 Y1_R32.1 | length 3.5
  Top Layer w0.1: v3(111.799,109.329) C1_R32.1@111.805,108.6
  Inner2 w0.1: v3@110.1,111.351 111.799,109.652 v3(111.799,109.329)
  other v3: 110.1,111.351
XC1_R33: C1_R33.1 U1_R33.B2 Y1_R33.1 | length 3.5
  Top Layer w0.1: v3(130.799,109.329) C1_R33.1@130.804,108.6
  Inner2 w0.1: v3(129.1,111.351) 130.799,109.652 v3(130.799,109.329)
XC1_R34: C1_R34.1 U1_R34.B2 Y1_R34.1 | length 3.5
  Top Layer w0.1: v3(149.799,109.329) C1_R34.1@149.804,108.6
  Inner2 w0.1: v3(148.1,111.351) 149.799,109.652 v3(149.799,109.329)
XC1_R41: C1_R41.1 U1_R41.B2 Y1_R41.1 | length 3.5
  Top Layer w0.1: v3(92.799,121.129) C1_R41.1@92.804,120.4
  Inner2 w0.1: v3(91.1,123.151) 92.799,121.452 v3(92.799,121.129)
XC1_R42: C1_R42.1 U1_R42.B2 Y1_R42.1 | length 3.5
  Top Layer w0.1: v3(111.799,121.129) C1_R42.1@111.805,120.4
  Inner2 w0.1: v3@110.1,123.151 111.799,121.452 v3(111.799,121.129)
  other v3: 110.1,123.151
XC1_R43: C1_R43.1 U1_R43.B2 Y1_R43.1 | length 3.5
  Top Layer w0.1: v3(130.799,121.129) C1_R43.1@130.804,120.4
  Inner2 w0.1: v3(129.1,123.151) 130.799,121.452 v3(130.799,121.129)
XC1_R44: C1_R44.1 U1_R44.B2 Y1_R44.1 | length 3.5
  Top Layer w0.1: v3(149.799,121.129) C1_R44.1@149.804,120.4
  Inner2 w0.1: v3(148.1,123.151) 149.799,121.452 v3(149.799,121.129)
XC1_R51: C1_R51.1 U1_R51.B2 Y1_R51.1 | length 3.5
  Top Layer w0.1: v3(92.799,132.929) C1_R51.1@92.804,132.2
  Inner2 w0.1: v3(91.1,134.951) 92.799,133.252 v3(92.799,132.929)
XC1_R52: C1_R52.1 U1_R52.B2 Y1_R52.1 | length 3.5
  Top Layer w0.1: v3(111.799,132.929) C1_R52.1@111.805,132.2
  Inner2 w0.1: v3@110.1,134.951 111.799,133.252 v3(111.799,132.929)
  other v3: 110.1,134.951
XC1_R53: C1_R53.1 U1_R53.B2 Y1_R53.1 | length 3.5
  Top Layer w0.1: v3(130.799,132.929) C1_R53.1@130.804,132.2
  Inner2 w0.1: v3(129.1,134.951) 130.799,133.252 v3(130.799,132.929)
XC1_R54: C1_R54.1 U1_R54.B2 Y1_R54.1 | length 3.5
  Top Layer w0.1: v3(149.799,132.929) C1_R54.1@149.804,132.2
  Inner2 w0.1: v3(148.1,134.951) 149.799,133.252 v3(149.799,132.929)
XC2_R11: C2_R11.1 U1_R11.A1 Y1_R11.3 | length 1.5
  Top Layer w0.1: U1_R11.A1@91.499,87.35 91.359,87.21 91.359,86.623 91.565,86.829 Y1_R11.3@92,86.83
XC2_R12: C2_R12.1 U1_R12.A1 Y1_R12.3 | length 1.5
  Top Layer w0.1: U1_R12.A1@110.5,87.35 110.359,87.21 110.359,86.623 110.565,86.829 Y1_R12.3@110.999,86.829
XC2_R13: C2_R13.1 U1_R13.A1 Y1_R13.3 | length 1.5
  Top Layer w0.1: U1_R13.A1@129.5,87.35 129.359,87.21 C2_R13.1@129.36,86.624 129.565,86.829 Y1_R13.3@130,86.83
XC2_R14: C2_R14.1 U1_R14.A1 Y1_R14.3 | length 1.5
  Top Layer w0.1: U1_R14.A1@148.499,87.35 148.359,87.21 C2_R14.1@148.36,86.624 148.565,86.829 Y1_R14.3@149,86.83
XC2_R21: C2_R21.1 U1_R21.A1 Y1_R21.3 | length 1.5
  Top Layer w0.1: U1_R21.A1@91.499,99.15 91.359,99.01 91.359,98.423 91.565,98.629 Y1_R21.3@91.999,98.629
XC2_R22: C2_R22.1 U1_R22.A1 Y1_R22.3 | length 1.5
  Top Layer w0.1: U1_R22.A1@110.5,99.15 110.359,99.01 110.359,98.423 110.565,98.629 Y1_R22.3@110.999,98.629
XC2_R23: C2_R23.1 U1_R23.A1 Y1_R23.3 | length 1.5
  Top Layer w0.1: U1_R23.A1@129.5,99.15 129.359,99.01 129.359,98.423 129.565,98.629 Y1_R23.3@129.999,98.629
XC2_R24: C2_R24.1 U1_R24.A1 Y1_R24.3 | length 1.5
  Top Layer w0.1: U1_R24.A1@148.499,99.15 148.359,99.01 148.359,98.423 148.565,98.629 Y1_R24.3@148.999,98.629
XC2_R31: C2_R31.1 U1_R31.A1 Y1_R31.3 | length 1.5
  Top Layer w0.1: U1_R31.A1@91.499,110.95 91.359,110.81 91.359,110.223 91.565,110.429 Y1_R31.3@92,110.43
XC2_R32: C2_R32.1 U1_R32.A1 Y1_R32.3 | length 1.5
  Top Layer w0.1: U1_R32.A1@110.5,110.95 110.359,110.81 110.359,110.223 110.565,110.429 Y1_R32.3@110.999,110.429
XC2_R33: C2_R33.1 U1_R33.A1 Y1_R33.3 | length 1.5
  Top Layer w0.1: U1_R33.A1@129.5,110.95 129.359,110.81 C2_R33.1@129.36,110.224 129.565,110.429 Y1_R33.3@130,110.43
XC2_R34: C2_R34.1 U1_R34.A1 Y1_R34.3 | length 1.5
  Top Layer w0.1: U1_R34.A1@148.499,110.95 148.359,110.81 C2_R34.1@148.36,110.224 148.565,110.429 Y1_R34.3@149,110.43
XC2_R41: C2_R41.1 U1_R41.A1 Y1_R41.3 | length 1.5
  Top Layer w0.1: U1_R41.A1@91.499,122.75 91.359,122.61 91.359,122.023 91.565,122.229 Y1_R41.3@92,122.23
XC2_R42: C2_R42.1 U1_R42.A1 Y1_R42.3 | length 1.5
  Top Layer w0.1: U1_R42.A1@110.5,122.75 110.359,122.61 110.359,122.023 110.565,122.229 Y1_R42.3@110.999,122.229
XC2_R43: C2_R43.1 U1_R43.A1 Y1_R43.3 | length 1.5
  Top Layer w0.1: U1_R43.A1@129.5,122.75 129.359,122.61 C2_R43.1@129.36,122.024 129.565,122.229 Y1_R43.3@130,122.23
XC2_R44: C2_R44.1 U1_R44.A1 Y1_R44.3 | length 1.5
  Top Layer w0.1: U1_R44.A1@148.499,122.75 148.359,122.61 C2_R44.1@148.36,122.024 148.565,122.229 Y1_R44.3@149,122.23
XC2_R51: C2_R51.1 U1_R51.A1 Y1_R51.3 | length 1.5
  Top Layer w0.1: U1_R51.A1@91.499,134.55 91.359,134.41 91.359,133.823 91.565,134.029 Y1_R51.3@91.999,134.029
XC2_R52: C2_R52.1 U1_R52.A1 Y1_R52.3 | length 1.5
  Top Layer w0.1: U1_R52.A1@110.5,134.55 110.359,134.41 110.359,133.823 110.565,134.029 Y1_R52.3@110.999,134.029
XC2_R53: C2_R53.1 U1_R53.A1 Y1_R53.3 | length 1.5
  Top Layer w0.1: U1_R53.A1@129.5,134.55 129.359,134.41 129.359,133.823 129.565,134.029 Y1_R53.3@129.999,134.029
XC2_R54: C2_R54.1 U1_R54.A1 Y1_R54.3 | length 1.5
  Top Layer w0.1: U1_R54.A1@148.499,134.55 148.359,134.41 148.359,133.823 148.565,134.029 Y1_R54.3@148.999,134.029
pads on no net: ANT1_R11.1 ANT1_R12.1 ANT1_R13.1 ANT1_R14.1 ANT1_R21.1 ANT1_R22.1 ANT1_R23.1 ANT1_R24.1 ANT1_R31.1 ANT1_R32.1 ANT1_R33.1 ANT1_R34.1 ANT1_R41.1 ANT1_R42.1 ANT1_R43.1 ANT1_R44.1 ANT1_R51.1 ANT1_R52.1 ANT1_R53.1 ANT1_R54.1 U1_R11.A4 U1_R11.A5 U1_R11.B3 U1_R11.B4 U1_R11.B5 U1_R11.C3 U1_R11.C7 U1_R11.D3 U1_R11.D7 U1_R11.E1 U1_R11.E2 U1_R11.E6 U1_R11.E7 U1_R11.F2 U1_R11.F3 U1_R11.F4 U1_R11.F6 U1_R11.F7 U1_R11.G4 U1_R11.G5 U1_R11.G6 U1_R11.G7 U1_R12.A4 U1_R12.A5 U1_R12.B3 U1_R12.B4 U1_R12.B5 U1_R12.C3 U1_R12.C7 U1_R12.D3 U1_R12.D7 U1_R12.E1 U1_R12.E2 U1_R12.E6 U1_R12.E7 U1_R12.F2 U1_R12.F3 U1_R12.F4 U1_R12.F6 U1_R12.F7 U1_R12.G4 U1_R12.G5 U1_R12.G6 U1_R12.G7 U1_R13.A4 U1_R13.A5 U1_R13.B3 U1_R13.B4 U1_R13.B5 U1_R13.C3 U1_R13.C7 U1_R13.D3 U1_R13.D7 U1_R13.E1 U1_R13.E2 U1_R13.E6 U1_R13.E7 U1_R13.F2 U1_R13.F3 U1_R13.F4 U1_R13.F6 U1_R13.F7 U1_R13.G4 U1_R13.G5 U1_R13.G6 U1_R13.G7 U1_R14.A4 U1_R14.A5 U1_R14.B3 U1_R14.B4 U1_R14.B5 U1_R14.C3 U1_R14.C7 U1_R14.D3 U1_R14.D7 U1_R14.E1 U1_R14.E2 U1_R14.E6 U1_R14.E7 U1_R14.F2 U1_R14.F3 U1_R14.F4 U1_R14.F6 U1_R14.F7 U1_R14.G4 U1_R14.G5 U1_R14.G6 U1_R14.G7 U1_R21.A4 U1_R21.A5 U1_R21.B3 U1_R21.B4 U1_R21.B5 U1_R21.C3 U1_R21.C7 U1_R21.D3 U1_R21.D7 U1_R21.E1 U1_R21.E2 U1_R21.E6 U1_R21.E7 U1_R21.F2 U1_R21.F3 U1_R21.F4 U1_R21.F6 U1_R21.F7 U1_R21.G4 U1_R21.G5 U1_R21.G6 U1_R21.G7 U1_R22.A4 U1_R22.A5 U1_R22.B3 U1_R22.B4 U1_R22.B5 U1_R22.C3 U1_R22.C7 U1_R22.D3 U1_R22.D7 U1_R22.E1 U1_R22.E2 U1_R22.E6 U1_R22.E7 U1_R22.F2 U1_R22.F3 U1_R22.F4 U1_R22.F6 U1_R22.F7 U1_R22.G4 U1_R22.G5 U1_R22.G6 U1_R22.G7 U1_R23.A4 U1_R23.A5 U1_R23.B3 U1_R23.B4 U1_R23.B5 U1_R23.C3 U1_R23.C7 U1_R23.D3 U1_R23.D7 U1_R23.E1 U1_R23.E2 U1_R23.E6 U1_R23.E7 U1_R23.F2 U1_R23.F3 U1_R23.F4 U1_R23.F6 U1_R23.F7 U1_R23.G4 U1_R23.G5 U1_R23.G6 U1_R23.G7 U1_R24.A4 U1_R24.A5 U1_R24.B3 U1_R24.B4 U1_R24.B5 U1_R24.C3 U1_R24.C7 U1_R24.D3 U1_R24.D7 U1_R24.E1 U1_R24.E2 U1_R24.E6 U1_R24.E7 U1_R24.F2 U1_R24.F3 U1_R24.F4 U1_R24.F6 U1_R24.F7 U1_R24.G4 U1_R24.G5 U1_R24.G6 U1_R24.G7 U1_R31.A4 U1_R31.A5 U1_R31.B3 U1_R31.B4 U1_R31.B5 U1_R31.C3 U1_R31.C7 U1_R31.D3 U1_R31.D7 U1_R31.E1 U1_R31.E2 U1_R31.E6 U1_R31.E7 U1_R31.F2 U1_R31.F3 U1_R31.F4 U1_R31.F6 U1_R31.F7 U1_R31.G4 U1_R31.G5 U1_R31.G6 U1_R31.G7 U1_R32.A4 U1_R32.A5 U1_R32.B3 U1_R32.B4 U1_R32.B5 U1_R32.C3 U1_R32.C7 U1_R32.D3 U1_R32.D7 U1_R32.E1 U1_R32.E2 U1_R32.E6 U1_R32.E7 U1_R32.F2 U1_R32.F3 U1_R32.F4 U1_R32.F6 U1_R32.F7 U1_R32.G4 U1_R32.G5 U1_R32.G6 U1_R32.G7 U1_R33.A4 U1_R33.A5 U1_R33.B3 U1_R33.B4 U1_R33.B5 U1_R33.C3 U1_R33.C7 U1_R33.D3 U1_R33.D7 U1_R33.E1 U1_R33.E2 U1_R33.E6 U1_R33.E7 U1_R33.F2 U1_R33.F3 U1_R33.F4 U1_R33.F6 U1_R33.F7 U1_R33.G4 U1_R33.G5 U1_R33.G6 U1_R33.G7 U1_R34.A4 U1_R34.A5 U1_R34.B3 U1_R34.B4 U1_R34.B5 U1_R34.C3 U1_R34.C7 U1_R34.D3 U1_R34.D7 U1_R34.E1 U1_R34.E2 U1_R34.E6 U1_R34.E7 U1_R34.F2 U1_R34.F3 U1_R34.F4 U1_R34.F6 U1_R34.F7 U1_R34.G4 U1_R34.G5 U1_R34.G6 U1_R34.G7 U1_R41.A4 U1_R41.A5 U1_R41.B3 U1_R41.B4 U1_R41.B5 U1_R41.C3 U1_R41.C7 U1_R41.D3 U1_R41.D7 U1_R41.E1 U1_R41.E2 U1_R41.E6 U1_R41.E7 U1_R41.F2 U1_R41.F3 U1_R41.F4 U1_R41.F6 U1_R41.F7 U1_R41.G4 U1_R41.G5 U1_R41.G6 U1_R41.G7 U1_R42.A4 U1_R42.A5 U1_R42.B3 U1_R42.B4 U1_R42.B5 U1_R42.C3 U1_R42.C7 U1_R42.D3 U1_R42.D7 U1_R42.E1 U1_R42.E2 U1_R42.E6 U1_R42.E7 U1_R42.F2 U1_R42.F3 U1_R42.F4 U1_R42.F6 U1_R42.F7 U1_R42.G4 U1_R42.G5 U1_R42.G6 U1_R42.G7 U1_R43.A4 U1_R43.A5 U1_R43.B3 U1_R43.B4 U1_R43.B5 U1_R43.C3 U1_R43.C7 U1_R43.D3 U1_R43.D7 U1_R43.E1 U1_R43.E2 U1_R43.E6 U1_R43.E7 U1_R43.F2 U1_R43.F3 U1_R43.F4 U1_R43.F6 U1_R43.F7 U1_R43.G4 U1_R43.G5 U1_R43.G6 U1_R43.G7 U1_R44.A4 U1_R44.A5 U1_R44.B3 U1_R44.B4 U1_R44.B5 U1_R44.C3 U1_R44.C7 U1_R44.D3 U1_R44.D7 U1_R44.E1 U1_R44.E2 U1_R44.E6 U1_R44.E7 U1_R44.F2 U1_R44.F3 U1_R44.F4 U1_R44.F6 U1_R44.F7 U1_R44.G4 U1_R44.G5 U1_R44.G6 U1_R44.G7 U1_R51.A4 U1_R51.A5 U1_R51.B3 U1_R51.B4 U1_R51.B5 U1_R51.C3 U1_R51.C7 U1_R51.D3 U1_R51.D7 U1_R51.E1 U1_R51.E2 U1_R51.E6 U1_R51.E7 U1_R51.F2 U1_R51.F3 U1_R51.F4 U1_R51.F6 U1_R51.F7 U1_R51.G4 U1_R51.G5 U1_R51.G6 U1_R51.G7 U1_R52.A4 U1_R52.A5 U1_R52.B3 U1_R52.B4 U1_R52.B5 U1_R52.C3 U1_R52.C7 U1_R52.D3 U1_R52.D7 U1_R52.E1 U1_R52.E2 U1_R52.E6 U1_R52.E7 U1_R52.F2 U1_R52.F3 U1_R52.F4 U1_R52.F6 U1_R52.F7 U1_R52.G4 U1_R52.G5 U1_R52.G6 U1_R52.G7 U1_R53.A4 U1_R53.A5 U1_R53.B3 U1_R53.B4 U1_R53.B5 U1_R53.C3 U1_R53.C7 U1_R53.D3 U1_R53.D7 U1_R53.E1 U1_R53.E2 U1_R53.E6 U1_R53.E7 U1_R53.F2 U1_R53.F3 U1_R53.F4 U1_R53.F6 U1_R53.F7 U1_R53.G4 U1_R53.G5 U1_R53.G6 U1_R53.G7 U1_R54.A4 U1_R54.A5 U1_R54.B3 U1_R54.B4 U1_R54.B5 U1_R54.C3 U1_R54.C7 U1_R54.D3 U1_R54.D7 U1_R54.E1 U1_R54.E2 U1_R54.E6 U1_R54.E7 U1_R54.F2 U1_R54.F3 U1_R54.F4 U1_R54.F6 U1_R54.F7 U1_R54.G4 U1_R54.G5 U1_R54.G6 U1_R54.G7 U3_R11.6 U3_R11.7 U3_R11.8 U3_R12.6 U3_R12.7 U3_R12.8 U3_R13.6 U3_R13.7 U3_R13.8 U3_R14.6 U3_R14.7 U3_R14.8 U3_R21.6 U3_R21.7 U3_R21.8 U3_R22.6 U3_R22.7 U3_R22.8 U3_R23.6 U3_R23.7 U3_R23.8 U3_R24.6 U3_R24.7 U3_R24.8 U3_R31.6 U3_R31.7 U3_R31.8 U3_R32.6 U3_R32.7 U3_R32.8 U3_R33.6 U3_R33.7 U3_R33.8 U3_R34.6 U3_R34.7 U3_R34.8 U3_R41.6 U3_R41.7 U3_R41.8 U3_R42.6 U3_R42.7 U3_R42.8 U3_R43.6 U3_R43.7 U3_R43.8 U3_R44.6 U3_R44.7 U3_R44.8 U3_R51.6 U3_R51.7 U3_R51.8 U3_R52.6 U3_R52.7 U3_R52.8 U3_R53.6 U3_R53.7 U3_R53.8 U3_R54.6 U3_R54.7 U3_R54.8 U10_P11.C1 U10_P11.C2 U10_P11.C3 U10_P11.C4 U10_P11.D2 U10_P12.C1 U10_P12.C2 U10_P12.C3 U10_P12.C4 U10_P12.D2 U10_P13.C1 U10_P13.C2 U10_P13.C3 U10_P13.C4 U10_P13.D2 U10_P14.C1 U10_P14.C2 U10_P14.C3 U10_P14.C4 U10_P14.D2 U10_P21.C1 U10_P21.C2 U10_P21.C3 U10_P21.C4 U10_P21.D2 U10_P22.C1 U10_P22.C2 U10_P22.C3 U10_P22.C4 U10_P22.D2 U10_P23.C1 U10_P23.C2 U10_P23.C3 U10_P23.C4 U10_P23.D2 U10_P24.C1 U10_P24.C2 U10_P24.C3 U10_P24.C4 U10_P24.D2 U10_P31.C1 U10_P31.C2 U10_P31.C3 U10_P31.C4 U10_P31.D2 U10_P32.C1 U10_P32.C2 U10_P32.C3 U10_P32.C4 U10_P32.D2 U10_P33.C1 U10_P33.C2 U10_P33.C3 U10_P33.C4 U10_P33.D2 U10_P34.C1 U10_P34.C2 U10_P34.C3 U10_P34.C4 U10_P34.D2 U10_P41.C1 U10_P41.C2 U10_P41.C3 U10_P41.C4 U10_P41.D2 U10_P42.C1 U10_P42.C2 U10_P42.C3 U10_P42.C4 U10_P42.D2 U10_P43.C1 U10_P43.C2 U10_P43.C3 U10_P43.C4 U10_P43.D2 U10_P44.C1 U10_P44.C2 U10_P44.C3 U10_P44.C4 U10_P44.D2 U10_P51.C1 U10_P51.C2 U10_P51.C3 U10_P51.C4 U10_P51.D2 U10_P52.C1 U10_P52.C2 U10_P52.C3 U10_P52.C4 U10_P52.D2 U10_P53.C1 U10_P53.C2 U10_P53.C3 U10_P53.C4 U10_P53.D2 U10_P54.C1 U10_P54.C2 U10_P54.C3 U10_P54.C4 U10_P54.D2 U11_P11.10 U11_P11.11 U11_P12.10 U11_P12.11 U11_P13.10 U11_P13.11 U11_P14.10 U11_P14.11 U11_P21.10 U11_P21.11 U11_P22.10 U11_P22.11 U11_P23.10 U11_P23.11 U11_P24.10 U11_P24.11 U11_P31.10 U11_P31.11 U11_P32.10 U11_P32.11 U11_P33.10 U11_P33.11 U11_P34.10 U11_P34.11 U11_P41.10 U11_P41.11 U11_P42.10 U11_P42.11 U11_P43.10 U11_P43.11 U11_P44.10 U11_P44.11 U11_P51.10 U11_P51.11 U11_P52.10 U11_P52.11 U11_P53.10 U11_P53.11 U11_P54.10 U11_P54.11